# Altium PCB PCB.PcbDoc
Units mm, origin at the board's own origin, x right, y up, seen from the top; angles counter-clockwise.
Board outline 88 x 40.5 mm, 2 copper layers (Top Layer, Bottom Layer); 12 components, 11 nets, 58 pads, 2 vias.
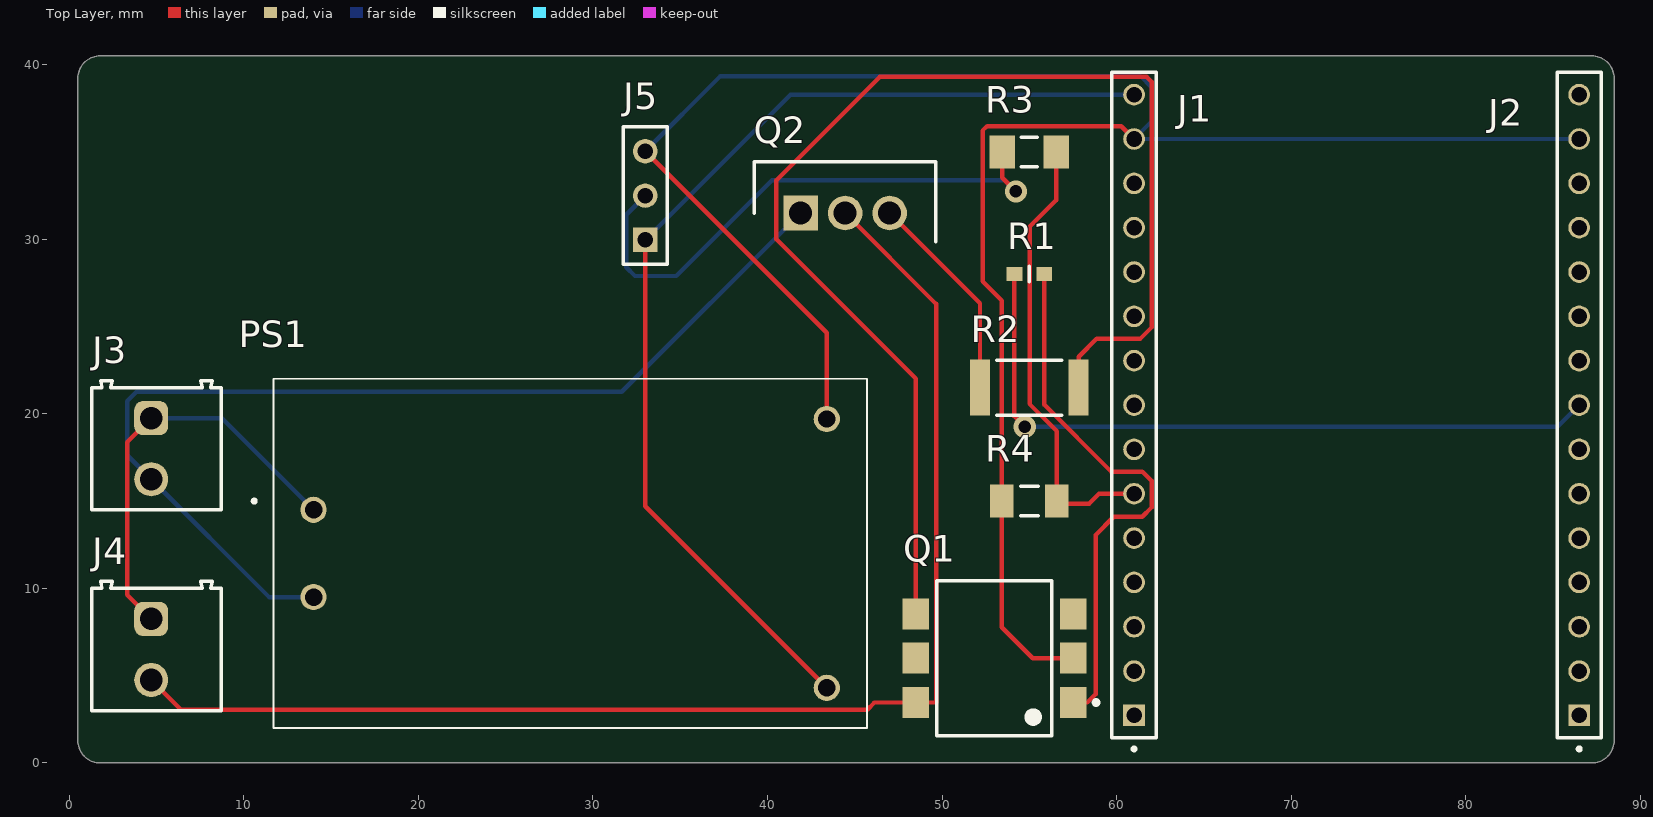
[diagram p0: Top Layer view]
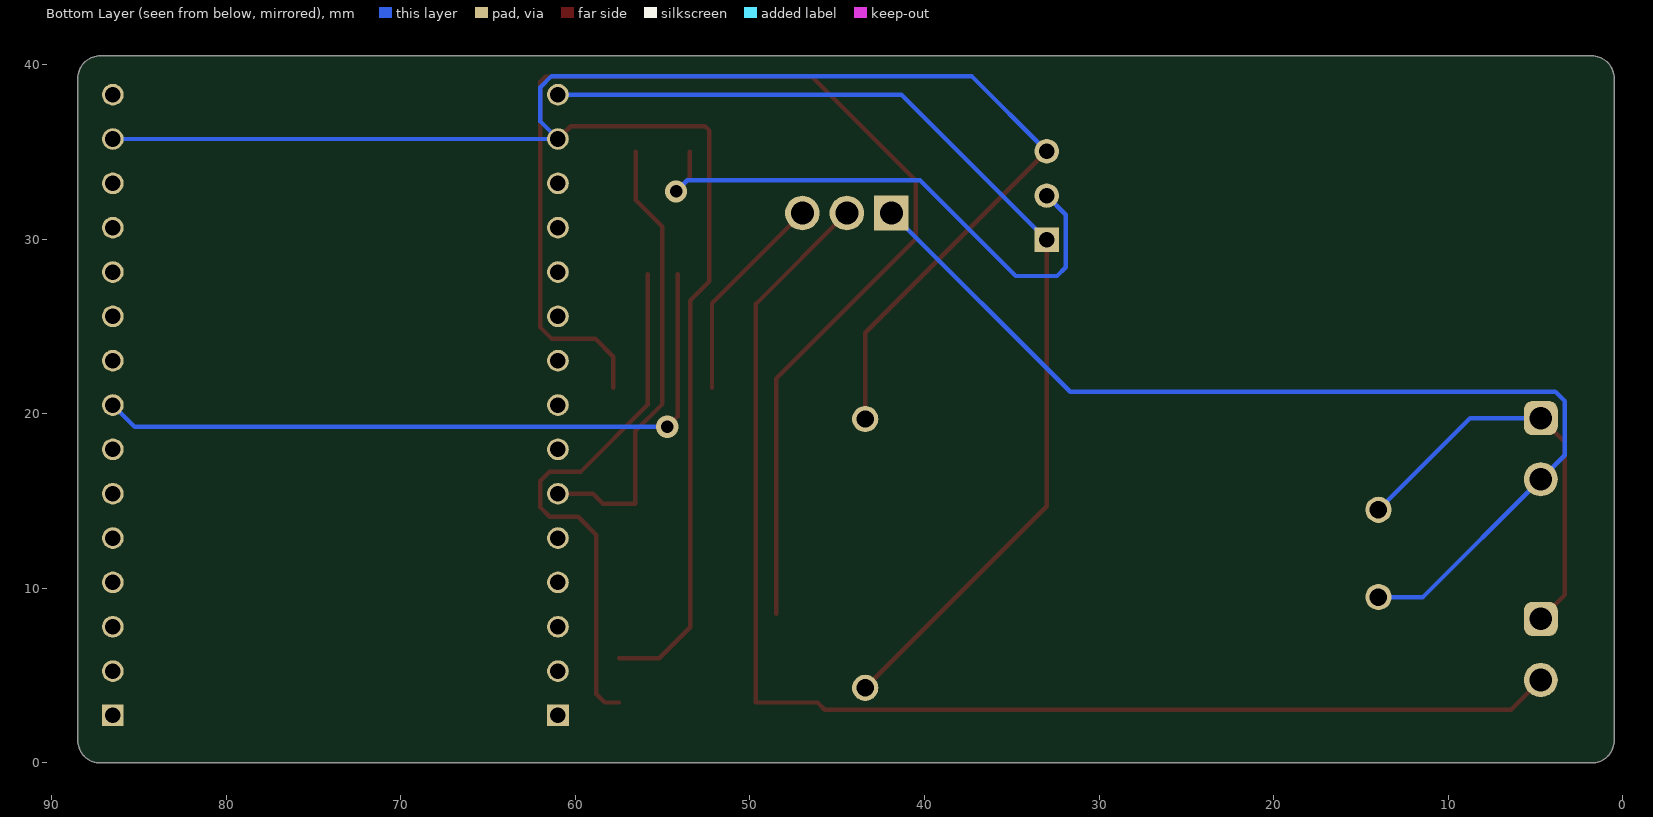
[diagram p1: Bottom Layer view, seen from below]
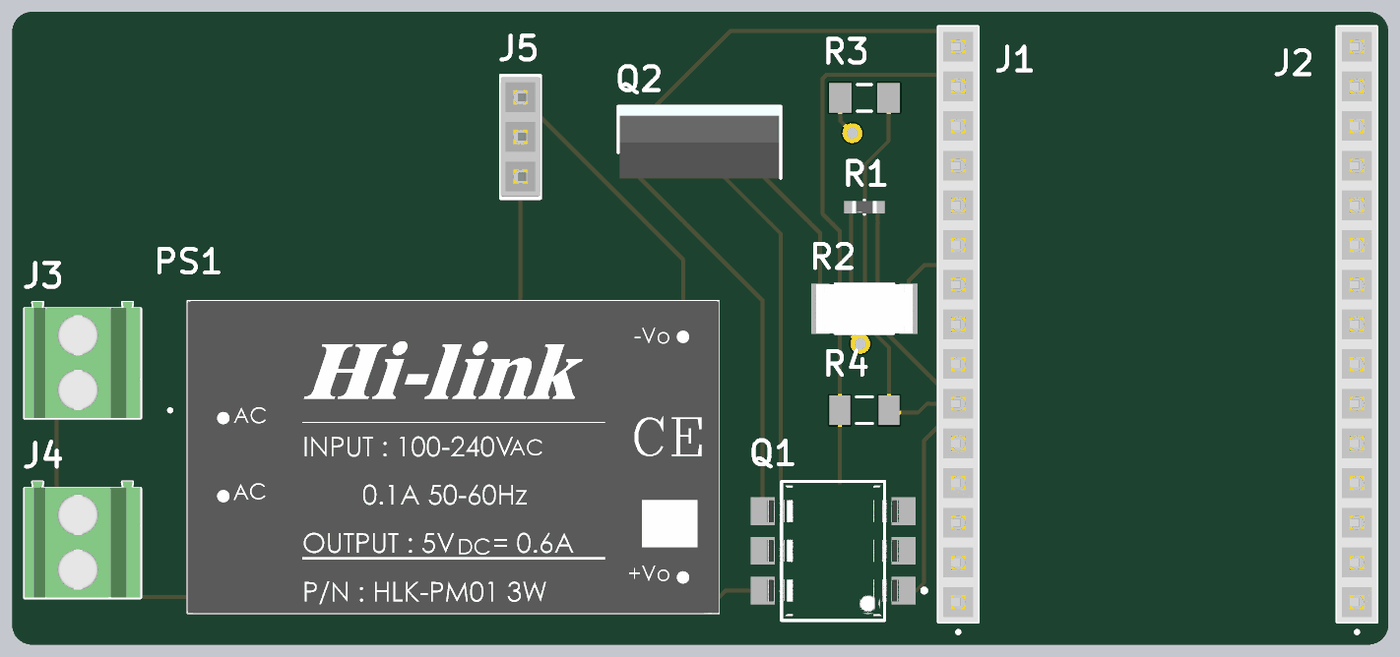
[diagram p2: 3D render of the assembled board from above, using the file's embedded part models]

## Layer stack, top to bottom
Top Solder: solder mask 0.0102, Solder Resist, Dk 3.5
Top Layer: signal copper 0.0356
Dielectric 1: dielectric 0.32, FR-4, Dk 4.8
Bottom Layer: signal copper 0.0356
Bottom Solder: solder mask 0.0102, Solder Resist, Dk 3.5

## Board outline
0.5,1.27 0.5,39.23 cw(c1.77,39.23) 1.77,40.5 87.23,40.5 cw(c87.23,39.23) 88.5,39.23 88.5,1.27 cw(c87.23,1.27) 87.23,0 1.77,0 cw(c1.77,1.27)

## Design rules (kind name [scope] priority, off if disabled: settings)
Clearance [All] p1: gap=0.254 ignorepadtopadclearanceinfootprint=FALSE
PolygonConnect [All] p1: connectstyle=Relief reliefconductorwidth=0.254 reliefentries=4 polygonreliefangle="90 Angle" airgapwidth=0.254
RoutingVias [All] p1: holewidth=0.711 width=1.27 viastyle="Through Hole" minholewidth=0.711 minwidth=1.27 maxholewidth=0.711 maxwidth=1.27
SolderMaskExpansion [All] p1: expansion=0.102 istentingtop=FALSE
SupplyNets "Schematic Supply Nets_3" [InNet('GND')] p1: voltage=0.000
SupplyNets "Schematic Supply Nets_2" [InNet('AC2')] p2: voltage=0.000
SupplyNets "Schematic Supply Nets_1" [InNet('AC1')] p3: voltage=0.000
SupplyNets "Schematic Supply Nets" [InNet('5V')] p4: voltage=0.000
Width [All] p1: maxlimit=0.254 minlimit=0.254 preferedwidth=0.254
30 further rules are at their usual default settings.

## Components (designator, comment, footprint, x,y, rotation, side; value= is the part's Value field where it differs from the comment)
J1 "BCS-115-L-S-TE" SAMTEC_BCS-115-L-S-TE 61,20.5 r90 top
J2 "BCS-115-L-S-TE" SAMTEC_BCS-115-L-S-TE 86.5,20.5 r90 top
J3 "691214110002" 691214110002 5,18 r270 top
J4 "691214110002" 691214110002 5,6.5 r270 top
J5 "BCS-103-F-S-TE" SMTC-BCS-103-X-S-TE 33,29.96 r90 top
PS1 "HLK-PM01" HLKPM01 14,14.5 r0 top
Q1 "MOC3021SR2M" FP-646BY-MFG 53,6 r180 top
Q2 "BTA16-600SWRG" TO255P460X1020X2005-3P 41.9,31.5 r0 top
R1 "100" FP-RC0603-0_55-MFG 55,28 r180 top
R2 "1k" FP-CRCW2512-e3-IPC_C 55,21.5 r0 top
R3 "10k" RESC3216X180X46ML20T20 55,35 r0 top
R4 "15k" RESC3216X70X40ML20T20 55,15 r0 top

## Footprints (in the part's own frame and the unit in brackets; to place one, negate y for a bottom-side part, rotate by r counter-clockwise, add the part's x,y. Pads: shape width x height; smd on the part's side, far side on the other; paste and mask are expansions set on the pad)
691214110002 [mm] "3.50 mm Horizontal Entry Modular, 2p"
  rrect50% 1.95x1.95 hole 1.3: 1(-1.75,-0.3)
  round 1.95 hole 1.3: 2(1.75,-0.3)
  silkscreen extent -3.9,-3.7 3.5,3.7, body extent -3.95,-3.7 3.5,3.7, height 8.55
FP-646BY-MFG [mm]
  rect 1.52x1.78 smd paste+0 mask+0: 1(-4.505,2.54) 2(-4.505,0) 3(-4.505,-2.54) 4(4.505,-2.54) 5(4.505,0) 6(4.505,2.54)
  silkscreen extent -5.95,-4.45 3.3,4.44, body extent -5.37,-4.67 5.37,4.67, height 0.25
FP-CRCW2512-e3-IPC_C [mm]
  rect 1.155x3.208 smd paste+0 mask+0: 1(-2.826,0) 2(2.826,0)
  silkscreen extent -1.87,-1.57 1.87,1.58, body extent -3.5,-1.75 3.5,1.75, height 0.25
FP-RC0603-0_55-MFG [mm]
  rect 0.9x0.8 smd paste+0 mask+0: 1(-0.85,0) 2(0.85,0)
  silkscreen extent 0,-0.45 0,0.45, body extent -1.4,-0.55 1.4,0.55, height 0.25
HLKPM01 [mm]
  round 1.5 hole 1: 1(0,0) 2(0,-5) 3(29.4,5.2) 4(29.4,-10.2)
  silkscreen extent -3.5,-12.5 31.7,7.5, body extent -2.3,-12.5 31.7,7.5, height 15.05
RESC3216X70X40ML20T20 [mm] "Chip Resistor, 2-Leads, Body 3.20x1.60mm, IPC Low Density"
  rect 1.35x1.9 smd: 1(-1.575,0) 2(1.575,0)
  silkscreen extent -0.5,-0.85 0.5,0.85, body extent -1.7,-0.9 1.7,0.9, height 0.7
RESC3216X180X46ML20T20 [mm] "Chip Resistor, 2-Leads, Body 3.20x1.60mm, IPC Low Density"
  rect 1.45x1.9 smd: 1(-1.55,0) 2(1.55,0)
  silkscreen extent -0.45,-0.85 0.45,0.85, body extent -1.7,-0.9 1.7,0.9, height 1.8
SAMTEC_BCS-115-L-S-TE [mm]
  rect 1.24x1.24 / inner round 1.24 / far side rect 1.24x1.24 hole 0.89: 01(-17.78,0)
  round 1.24 hole 0.89: 02(-15.24,0) 03(-12.7,0) 04(-10.16,0) 05(-7.62,0) 06(-5.08,0) 07(-2.54,0) 08(0,0) 09(2.54,0) 10(5.08,0) 11(7.62,0) 12(10.16,0) 13(12.7,0) 14(15.24,0) 15(17.78,0)
  silkscreen extent -19.8,-1.27 19.05,1.27, body extent -19.05,-1.27 19.05,1.27, height 7.37
SMTC-BCS-103-X-S-TE [mm] "Box Connector Socket Strip, 1x3 Pins, Vertical, 2.54mm Pitch, Female"
  rect 1.4x1.4 hole 0.89: 1(0,0)
  round 1.4 hole 0.89: 2(2.54,0) 3(5.08,0)
  silkscreen extent -1.39,-1.27 6.48,1.27, body extent -1.27,-1.27 6.35,1.27, height 7.37
TO255P460X1020X2005-3P [mm]
  rect 1.98x1.98 hole 1.32: 1(0,0)
  round 1.98 hole 1.32: 2(2.55,0) 3(5.1,0)
  silkscreen extent -2.65,-1.65 7.75,2.95, body extent -2.55,-1.65 7.65,2.95, height 20.05

## Part data
J1 J2: library part CMP-002-00071-2, "15 Position Receptacle Connector 0.100 (2.54mm) Through Hole Gold", Case/Package=None, Check_prices=https://www.snapeda.com/parts/BCS-115-L-S-TE/Samtec+Inc./view-part/?ref=eda, Component Type=Standard, Design Item ID=BCS-115-L-S-TE, Digi-Key_Part_Number=SAM1011-15-ND, MF="Samtec Inc.", MP=BCS-115-L-S-TE, Pins=15, Purchase-URL=https://pricing.snapeda.com/search/part/BCS-115-L-S-TE/?ref=eda, SnapEDA_Link=https://www.snapeda.com/parts/BCS-115-L-S-TE/Samtec+Inc./view-part/?ref=snap, Source=BCS-115-L-S-TE.SchLib
J3 J4: library part CMP-1502-02464-2, "Terminal Block", Color="Blue, Green", Current=10A, Max Operating Temperature=105°C, Min Operating Temperature=-40°C, Voltage=300V, Contact Material=Brass, Contact Plating="Brass, Tin", Current Rating=10A, Height=8.7mm, Housing Material=Nylon, Lead Pitch=3.5mm, Length=7.4mm, Mount="Through Hole", NexarPartId=18818288, Number of Contacts=2, Number of Levels=1, Number of Pins=2, Number of Positions Per Level=2, Number of Rows=1, Packaging=Box, Pitch=3.5052mm, Plating="Brass, Steel", REACH SVHC=Unknown, RoHS=Compliant, Stripping Length=-6mm, Termination=Screw, Voltage Rating=300V, Width=7.9mm, Wire Gauge (Max)=24AWG, Wire Gauge (Min)=16AWG, Wire/Cable Gauge=24AWG
J5: library part CMP-1023-00006-1, "Tiger Claw(TM) Pass-Through Socket, Vertical, -55 to 125 degC, 2.54 mm Pitch, 3-Pin, Female, RoHS", Manufacturer=Samtec, Temperature Range="-55 to 125 degC", ComponentLink1Description="Manufacturer URL", ComponentLink1URL=http://www.samtec.com, ComponentLink2Description=Datasheet, ComponentLink2URL=http://www.samtec.com/documents/webfiles/pdf/BCS.PDF, ComponentLink3Description="Package Specification", ComponentLink3URL=http://www.samtec.com/documents/webfiles/cpdf/BCS-1XX-XXX-X-XX-XXX-MKT.pdf, DatasheetVersion=F-214, Mounting Technology=Through-hole, Orientation=Vertical, PackageDescription="Box Connector Socket Strip", PackageReference=BCS-103-X-S-TE, PackageVersion="BV, 9/1991", PartNumber=BCS-103-F-S-TE, Pitch="2.54 mm", RoHS=True
PS1: "Power Supply", Manufacturer_Name=Hi-Link, Datasheet Link=https://datasheet.lcsc.com/szlcsc/1906201102_HI-LINK-HLK-PM03_C209904.pdf, Height=15mm, Manufacturer_Part_Number=HLK-PM01
Q1: library part CMP-00278-84330365-1, "MOC3021SR2M Triac Driver Output Optocoupler, 6-Pin DIP 400V Random Phase", Case/Package=SMD/SMT, Forward Current=60mA, Forward Voltage=1.15V, Hold Current=100µA, Isolation Voltage=5.3kV, Manufacturer Lifecycle Status=ACTIVE, Max Input Voltage=1.5V, Max Operating Temperature=85°C, Max Power Dissipation=330mW, Min Operating Temperature=-40°C, Output Voltage=400V, Reverse Breakdown Voltage=3V, Approvals=UL, Input Current=60mA, Lead Free="Lead Free", Lifecycle Status=Production, Max Input Current=60mA, Mount="Surface Mount", NexarPartId=84330365, Nominal Input Voltage=1.15V, Number of Channels=1, Number of Circuits=1, Number of Elements=1, Number of Pins=6, Power Dissipation=330mW, Radiation Hardening=No, REACH SVHC="No SVHC", RoHS=Compliant, Schedule B="8541408000, 8541408000", Weight=810mg
Q2: "Triac A", Manufacturer_Name=STMicroelectronics, Mouser Part Number=511-BTA16-600SW, Arrow Part Number=BTA16-600SWRG, Arrow Price/Stock=https://www.arrow.com/en/products/bta16-600swrg/stmicroelectronics?utm_currency=USD&region=europe, Datasheet Link=http://www.st.com/web/en/resource/technical/document/datasheet/CD00002265.pdf, Height=4.6mm, Manufacturer_Part_Number=BTA16-600SWRG, Mouser Price/Stock=https://www.mouser.co.uk/ProductDetail/STMicroelectronics/BTA16-600SWRG?qs=zgJYeb29rD7irNzaclX92Q%3D%3D
R1: library part CMP-2100-03663-2, Case Code (Imperial)=0603, Max Operating Temperature=155°C, Min Operating Temperature=-55°C, Power Rating=100mW, Resistance=100Ω, Temperature Coefficient=100ppm/°C, Tolerance=1%, Voltage Rating=50V, Case Code (Metric)=0603, Case/Package=0603, Composition="Thick Film", Depth=800µm, Height=450µm, Lead Free="Lead Free", Length=1.6mm, Military Standard=Not, NexarPartId=55402879, Number of Pins=2, Packaging="Tape & Reel", REACH SVHC=Unknown, RoHS=Compliant, Schedule B="8533210045, 8533210045", Termination=SMD/SMT, Voltage Rating (DC)=50V, Width=800µm
R2: library part CMP-02407-005880-1, "RES Thick Film, 1kΩ, 1%, 1W, 100ppm/°C, 2512", Case Code (Imperial)=2512, Case Code (Metric)=6432, Max Operating Temperature=155°C, Max Power Dissipation=1W, Min Operating Temperature=-55°C, Package Quantity=10, Resistance=1kR, Temperature Coefficient=100ppm/°C, Tolerance=1%, Voltage Rating=500V, Case/Package=2512, Composition="Thick Film", Contact Plating=Tin, Depth=3.15mm, Features="Automotive AEC-Q200", Height=0.6mm, Lead Free="Lead Free", Length=6.3mm, Military Standard=Not, Mount="Surface Mount", Number of Pins=2, Number of Terminations=2, Packaging="Tape and Reel", Power Rating=1W, Radiation Hardening=No, Termination=SMD/SMT, Voltage Rating (DC)=500V, Weight=0.001429oz, Width=3.15mm
R3: library part CMP-2001-04239-1, Manufacturer="Vishay Dale", Part Number=NTHS1206N02N1002KE
R4: library part CMP-2003-04883-1, Manufacturer="KOA Speer", Part Number=RK73B2BTTD153J

## Via types
v1: diameter 1.27, hole 0.711, Top Layer to Bottom Layer, 2 vias

## Nets (pads, with @x,y where several pads share a name; then routed paths per layer and width w, separated by ;. In a path a pad name is that pad's centre, name@x,y a point inside that pad or via, vN(x,y) a via of type N, cw(c..) or ccw(c..) an arc to the next point about the centre after c; other vN are vias at no path point)
5V: J1.15 J5.1 PS1.4 | length 61.4
  Top Layer w0.254: J5.1 33,14.7 PS1.4
  Bottom Layer w0.254: J5.1 41.32,38.28 J1.15
AC1: J3.1 J4.1 PS1.1 | length 24.1
  Top Layer w0.254: J4.1 3.329,9.621 3.329,18.379 J3.1
  Bottom Layer w0.254: J3.1 8.75,19.75 PS1.1
AC2: J3.2 PS1.2 Q2.1 | length 60.2
  Bottom Layer w0.254: PS1.2 11.45,9.5 J3.2 3.329,17.621 3.329,20.728 3.862,21.261 31.661,21.261 Q2.1
D5: J2.08 R1.2 | length 41.3
  Top Layer w0.254: R1.2 54.15,19.843 v1(54.739,19.255)
  Bottom Layer w0.254: v1(54.739,19.255) 85.255,19.255 J2.08
D32: J1.06 R3.2 R4.2 | length 26.1
  Top Layer w0.254: R3.2 56.55,32.242 55.018,30.71 55.018,20.564 56.575,19.007 R4.2 56.575,14.852 58.426,14.852 58.994,15.42 J1.06
GND: J1.14 J2.14 J5.3 PS1.3 Q1.2 R4.1 | length 122.4
  Top Layer w0.254: J5.3 43.4,24.64 PS1.3 ; Q1.2 55.199,6 53.425,7.774 R4.1 53.425,26.487 52.326,27.586 52.326,36.222 52.58,36.476 60.264,36.476 J1.14
  Bottom Layer w0.254: J5.3 37.306,39.346 61.368,39.346 62.003,38.711 62.003,36.743 J1.14 J2.14
NetJ4_2: J4.2 Q1.6 Q2.2 | length 76
  Top Layer w0.254: J4.2 6.4,3.05 45.718,3.05 46.128,3.46 Q1.6 49.659,3.46 49.659,26.291 Q2.2
NetJ5_2: J5.2 R3.1 | length 32.2
  Top Layer w0.254: R3.1 53.45,33.523 v1(54.231,32.742)
  Bottom Layer w0.254: J5.2 31.904,31.404 31.904,28.399 32.412,27.891 34.774,27.891 40.261,33.377 53.596,33.377 v1(54.231,32.742)
NetQ1_1: Q1.1 R1.1 | length 31.4
  Top Layer w0.254: R1.1 55.85,20.526 59.687,16.689 61.47,16.689 62.003,16.156 62.003,14.632 61.47,14.099 59.844,14.099 58.803,13.057 58.803,3.943 58.32,3.46 Q1.1
NetQ1_4: Q1.4 R2.2 | length 72.9
  Top Layer w0.254: Q1.4 48.495,22.019 40.515,29.999 40.515,33.377 46.433,39.295 61.724,39.295 62.003,39.016 62.003,24.944 61.368,24.309 58.867,24.309 57.826,23.268 R2.2
NetQ2_3: Q2.3 R2.1 | length 12.1
  Top Layer w0.254: Q2.3 52.174,26.326 R2.1
pads on no net: J1.01 J1.02 J1.03 J1.04 J1.05 J1.07 J1.08 J1.09 J1.10 J1.11 J1.12 J1.13 J2.01 J2.02 J2.03 J2.04 J2.05 J2.06 J2.07 J2.09 J2.10 J2.11 J2.12 J2.13 J2.15 Q1.3 Q1.5

## Silkscreen, mask and mechanical layers (free items; w line width, h text height)
Mechanical 1:
  lines w0.254: 0.5,1.27 ccw(c1.77,1.27) 1.77,0 29.5,0 87.23,0 ccw(c87.23,1.27) 88.5,1.27 88.5,39.23 ccw(c87.23,39.23) 87.23,40.5 1.77,40.5 ccw(c1.77,39.23) 0.5,39.23 0.5,1.27